# Altium PCB OmniCore_SDR.PcbDoc (part 7 of 13)
Units mil, origin at the board's own origin, x right, y up, seen from the top; angles counter-clockwise.
Board outline 4724.72 x 2755.91 mil, 8 copper layers (Top, GND 1, Layer 1, Layer 2, GND 2, Layer 3, Power, Bottom), stack 40.468 mil thick; 530 components, 427 nets, 2315 pads, 1715 vias.
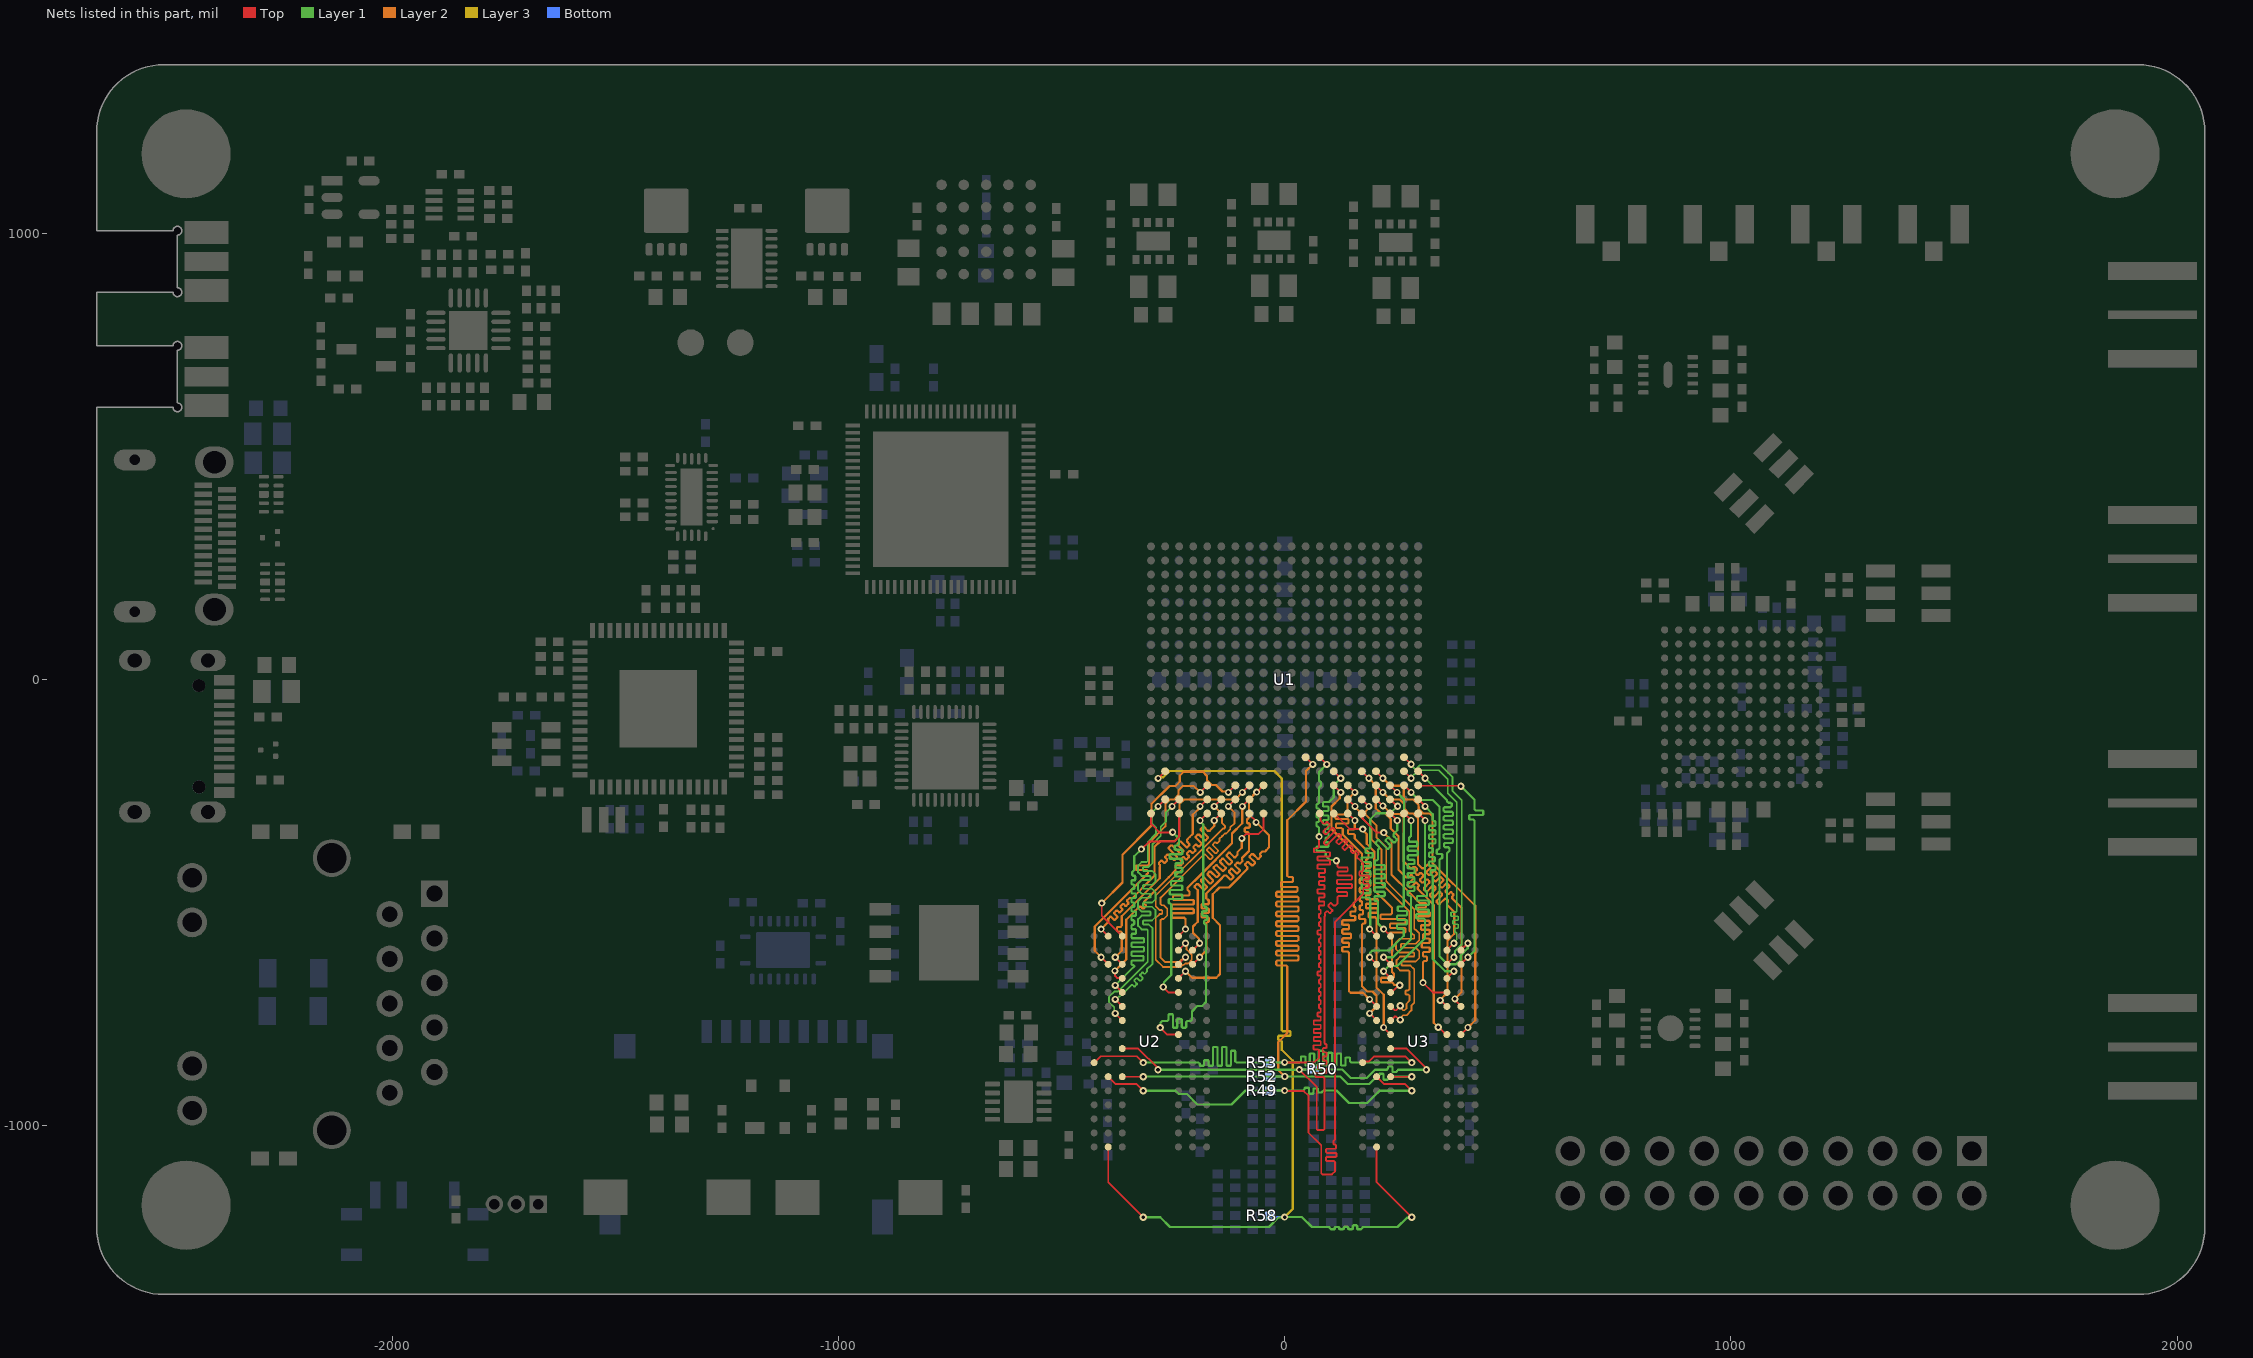
[diagram p12: the nets of this part, all layers, seen from the top]

## Via types
v1: diameter 16, hole 8, Top to Bottom, tented both sides, 1667 vias
v2: diameter 19.68, hole 7.87, Top to Bottom, 44 vias
v3: diameter 200, hole 125, Top to Bottom, 4 vias

## Nets (pads, with @x,y where several pads share a name; then routed paths per layer and width w, separated by ;. In a path a pad name is that pad's centre, name@x,y a point inside that pad or via, vN(x,y) a via of type N, cw(c..) or ccw(c..) an arc to the next point about the centre after c; other vN are vias at no path point) (continued)
DDR3_D6: U1.C1 U2.E3 | length 743.4
  Top w4.2: v1(-379.73,-685.23) U2.E3@-363.98,-700.98 ; v1(-321,-380) -304,-363 -247,-363 -236.46,-352.46 U1.C1@-236.46,-300
  Layer 1 w5: v1(-379.73,-685.23) -339.42,-644.92 -337,-642.5 -337,-642.42 -339.93,-639.49 -341.5,-639.49 -343,-637.99 -343,-630.99 -341.5,-629.49 -317.71,-629.49 -316.21,-627.99 -316.21,-620.99 -317.71,-619.49 -341.5,-619.49 -343,-617.99 -343,-610.99 -341.5,-609.49 -317,-609.49 -315.5,-607.99 -315.5,-600.99 -317,-599.49 -341.5,-599.49 -343,-597.99 -343,-590.99 -341.5,-589.49 -317,-589.49 -315.5,-587.99 -315.5,-580.99 -317,-579.49 -341.5,-579.49 -343,-577.99 -343,-570.99 -341.5,-569.49 -334.59,-569.49 -333.09,-567.99 -333.09,-560.99 -334.59,-559.49 -341.5,-559.49 -343,-557.99 -343,-550.99 -341.5,-549.49 -338.5,-549.49 -337,-547.99 -337,-540.99 -338.5,-539.49 -341.5,-539.49 -343,-537.99 -343,-530.99 -341.5,-529.49 -334.86,-529.49 -333.36,-527.99 -333.36,-520.99 -334.86,-519.49 -341.5,-519.49 -343,-517.99 -343,-510.99 -341.5,-509.49 -338.5,-509.49 -337,-507.99 -337,-500.99 -338.5,-499.49 -341.5,-499.49 -343,-497.99 -343,-490.99 -341.5,-489.49 -334.86,-489.49 -333.36,-487.99 -333.36,-480.99 -334.86,-479.49 -341.5,-479.49 -343,-477.99 -343,-470.99 -341.5,-469.49 -338.5,-469.49 -337,-467.99 -337,-460.99 -338.5,-459.49 -341.5,-459.49 -343,-457.99 -343,-450.99 -341.5,-449.49 -336.14,-449.49 -334.64,-447.99 -334.64,-440.99 -336.14,-439.49 -339.93,-439.49 -341.43,-437.99 -341.43,-430.99 -339.93,-429.49 -337,-426.56 -337,-407 -337,-396 v1(-321,-380)
DDR3_D7: U1.E1 U2.H7 | length 741.3
  Top w4.2: v1(-279,-780) -263.53,-795.47 U2.H7@-238,-795.47 ; v1(-189.5,-315.75) -189.36,-315.75 -173.61,-300 U1.E1@-173.47,-300
  Layer 1 w5: v1(-279,-780) -278.04,-779.04 -278.04,-769.04 -274.22,-765.22 -266,-765.22 -263.5,-765.22 -260.57,-762.29 -260.57,-751.72 -259.07,-750.22 -252.07,-750.22 -250.57,-751.72 -250.57,-778.72 -249.07,-780.22 -242.07,-780.22 -240.57,-778.72 -240.57,-761.91 -239.07,-760.41 -232.07,-760.41 -230.57,-761.91 -230.57,-778.72 -229.07,-780.22 -222.07,-780.22 -220.57,-778.72 -220.57,-768.15 -217.64,-765.22 -210.68,-765.22 -207.75,-762.29 -207.75,-743.75 -195.23,-731.23 -184.75,-731.23 -176.26,-722.74 -176.26,-551.49 -176.26,-550.74 -180.93,-546.07 -180.93,-541.92 -178.01,-538.99 -175.15,-538.99 -173.65,-537.49 -173.65,-530.49 -175.15,-528.99 -183.07,-528.99 -184.57,-527.49 -184.57,-520.49 -183.07,-518.99 -176.16,-518.99 -174.66,-517.49 -174.66,-510.49 -176.16,-508.99 -179.42,-508.99 -182.35,-506.07 -182.35,-353 -182.35,-324.65 -189.5,-317.5 v1(-189.5,-315.75)
DDR3_D8: U1.E2 U2.C3 | length 619
  Top w4.2: v1(-379.73,-622.24) U2.C3@-363.98,-637.99 ; v1(-189.5,-284.25) -189.36,-284.25 -173.61,-268.5 U1.E2@-173.47,-268.5
  Layer 2 w5: v1(-379.73,-622.24) -365.23,-607.74 -365.23,-569.75 -365.23,-567.25 -368.16,-564.32 -374.03,-564.32 -375.53,-562.82 -375.53,-555.82 -374.03,-554.32 -368.16,-554.32 -365.23,-551.39 -365.23,-540 -365.23,-530.23 -280,-445 -280,-422.66 -280,-420 -279.56,-419.56 -279.56,-415.42 -281.94,-413.04 -281.94,-410.92 -276.99,-405.97 -274.87,-405.97 -270.51,-410.33 -268.39,-410.33 -263.44,-405.38 -263.44,-403.26 -267.79,-398.91 -267.79,-396.79 -262.84,-391.84 -260.71,-391.84 -248.46,-404.1 -246.34,-404.1 -241.39,-399.15 -241.39,-397.02 -259.78,-378.63 -259.78,-376.51 -254.83,-371.56 -252.71,-371.56 -234.32,-389.95 -232.2,-389.95 -227.25,-385 -227.25,-382.88 -240.14,-369.99 -240.14,-367.87 -235.19,-362.92 -233.07,-362.92 -220.18,-375.81 -218.05,-375.81 -213.1,-370.86 -213.1,-368.74 -218.85,-362.99 -218.85,-358.85 -212.5,-352.5 -206,-346 -206,-302.99 -189.5,-286.49 v1(-189.5,-284.25)
DDR3_D9: U1.E3 U2.C2 | length 618.3
  Top w4.2: v1(-411.23,-622.24) U2.C2@-395.48,-637.99 ; v1(-189.22,-252.76) U1.E3@-173.47,-237.01
  Layer 2 w5: v1(-411.23,-622.24) -425.73,-607.74 -425.73,-553.24 -381.56,-509.08 -317.24,-444.76 -308.93,-436.44 -306.43,-433.94 -306.43,-429.8 -309.36,-426.87 -332.5,-426.87 -334,-425.37 -334,-418.37 -332.5,-416.87 -306.93,-416.87 -304,-413.94 -304,-386 -304,-365.12 -267.36,-328.48 -267.36,-278.89 -257.47,-269 -247.95,-269 -237.71,-258.76 -237.71,-247.71 -228.26,-238.26 -203.72,-238.26 v1(-189.22,-252.76)
DDR3_D10: U1.G3 U2.A3 | length 618.8
  Top w4.2: v1(-410,-501) -410,-528.98 U2.A3@-363.98,-575 ; v1(-126.23,-252.76) U1.G3@-110.48,-237.01
  Layer 2 w5: v1(-410,-501) -363.5,-454.5 -363.5,-392.5 -298.21,-327.21 -298.21,-278.25 -258.22,-238.26 -244.26,-238.26 -235.22,-229.22 -235.22,-215.25 -226.72,-206.76 -183.21,-206.76 -174,-215.97 -174,-225.49 -163.49,-236 -153.97,-236 -139.32,-250.65 -128.33,-250.65 v1(-126.23,-252.76)
DDR3_D11: U1.H3 U2.A2 | length 619
  Top w4.2: v1(-411.23,-559.25) U2.A2@-395.48,-575 ; v1(-94.73,-252.76) U1.H3@-78.98,-237.01
  Layer 2 w5: v1(-411.23,-559.25) -397.13,-545.15 -395.36,-543.38 -395.36,-539.24 -396.12,-538.48 -396.12,-536.36 -391.17,-531.41 -389.05,-531.41 -382.36,-538.09 -380.24,-538.09 -375.29,-533.14 -375.29,-531.02 -381.98,-524.34 -381.98,-522.22 -377.03,-517.27 -374.9,-517.27 -371.01,-521.16 -368.89,-521.16 -363.94,-516.21 -363.94,-514.09 -367.83,-510.2 -367.83,-508.08 -362.88,-503.13 -360.76,-503.13 -357.27,-506.62 -355.14,-506.62 -350.19,-501.67 -350.19,-499.55 -352.93,-496.81 -352.93,-494.69 -347.98,-489.74 -345.86,-489.74 -341.72,-489.74 -300.49,-448.51 -292,-440.02 -292,-375 -278.5,-361.5 -246.5,-361.5 -236,-351 -236,-279.25 -225.75,-269 -110.98,-269 v1(-94.73,-252.76)
DDR3_D12: U1.J3 U2.C8 | length 616.9
  Top w4.2: U2.C8@-206.5,-637.99 v1(-190.76,-622.24) ; v1(-62.84,-252.15) -62.74,-252.15 -47.6,-237.01 U1.J3@-47.49,-237.01
  Layer 2 w5: v1(-190.76,-622.24) -176.66,-608.14 ; -175.58,-605.01 -175.58,-558.7 -175.58,-546.2 -172.65,-543.27 -171.5,-543.27 -170,-541.77 -170,-534.77 -171.5,-533.27 -184.5,-533.27 -186,-531.77 -186,-524.77 -184.5,-523.27 -171.5,-523.27 -170,-521.77 -170,-514.77 -171.5,-513.27 -184.5,-513.27 -186,-511.77 -186,-504.77 -184.5,-503.27 -171.5,-503.27 -170,-501.77 -170,-494.77 -171.5,-493.27 -172.65,-493.27 -175.58,-490.34 -175.58,-479.58 -144,-448 -135.16,-439.16 -131.02,-439.16 -122.01,-448.17 -119.89,-448.17 -114.94,-443.22 -114.94,-441.09 -124.96,-431.08 -124.96,-428.96 -120.01,-424.01 -117.89,-424.01 -107.87,-434.02 -105.75,-434.02 -100.8,-429.07 -100.8,-426.95 -110.82,-416.94 -110.82,-414.82 -105.87,-409.87 -103.74,-409.87 -101.74,-411.87 -99.62,-411.87 -94.67,-406.92 -94.67,-404.8 -95.66,-403.81 -95.66,-399.66 -80,-384 -80,-359 -80,-347.57 -80,-345.07 -82.93,-342.14 -87.86,-342.14 -89.36,-340.64 -89.36,-333.64 -87.86,-332.14 -80,-332.14 -78.5,-330.64 -78.5,-323.64 -80,-322.14 -83.12,-322.14 -84.62,-320.64 -84.62,-313.64 -83.12,-312.14 -82.93,-312.14 -80,-309.21 -80,-299 -80,-269 -63.15,-252.15 v1(-62.84,-252.15)
DDR3_D13: U1.H2 U2.A7 | length 618.8
  Top w4.2: U2.A7@-238,-575 v1(-222.25,-559.25) ; v1(-94.75,-284.24) U1.H2@-78.98,-268.5
  Layer 2 w5: v1(-222.25,-559.25) -222.25,-536.75 -225.18,-533.82 -250.75,-533.82 -252.25,-532.32 -252.25,-525.32 -250.75,-523.82 -205.5,-523.82 -204,-522.32 -204,-515.32 -205.5,-513.82 -250.75,-513.82 -252.25,-512.32 -252.25,-505.32 -250.75,-503.82 -205.5,-503.82 -204,-502.32 -204,-495.32 -205.5,-493.82 -248.69,-493.82 -250.19,-492.32 -250.19,-485.32 -248.69,-483.82 -214.82,-483.82 -213.32,-482.32 -213.32,-475.32 -214.82,-473.82 -217.75,-470.89 -217.75,-466.75 -190,-439 -118,-367 -118,-344.75 -95.13,-321.88 -95.13,-284.63 v1(-94.75,-284.24)
DDR3_D14: U1.H1 U2.D7 | length 619.7
  Top w4.2: U2.D7@-238,-669.49 v1(-222.25,-653.74) ; U1.H1@-78.98,-300 -78.98,-302.51 -64,-317.49 v1(-64,-320)
  Layer 2 w5: v1(-222.25,-653.74) -207.75,-668.24 -153.24,-668.24 -144.76,-659.76 -144.76,-550.24 -161,-534 -161,-481.09 -145.91,-466 -125,-466 -113.75,-454.75 -83.7,-424.7 -83.7,-420.56 -88.57,-415.68 -88.57,-413.56 -83.62,-408.61 -81.5,-408.61 -73.48,-416.63 -71.36,-416.63 -66.41,-411.68 -66.41,-409.56 -78.08,-397.89 -78.08,-395.77 -73.13,-390.82 -71,-390.82 -60.41,-401.41 -58.29,-401.41 -53.34,-396.46 -53.34,-394.34 -55.41,-392.27 -55.41,-390.15 -50.46,-385.2 -48.34,-385.2 -44.2,-385.2 -41.31,-382.31 -35,-376 -35,-349 v1(-64,-320)
DDR3_D15: U1.J1 U2.B8 | length 619.2
  Top w4.2: U2.B8@-206.5,-606.49 v1(-190.76,-590.75) ; v1(-96,-356) -86,-346 -58,-346 -47.49,-335.49 U1.J1@-47.49,-300
  Layer 2 w5: v1(-190.76,-590.75) -192,-589.5 -192,-581 -205.26,-567.74 -205.26,-553.24 -195,-542.99 -195,-503.64 -195,-476 -194.98,-471.84 -201.49,-465.33 -201.49,-463.21 -196.54,-458.26 -194.41,-458.26 -181.76,-470.91 -179.64,-470.91 -174.69,-465.96 -174.69,-463.84 -187.34,-451.19 -187.34,-449.07 -182.39,-444.12 -180.27,-444.12 -167.62,-456.77 -165.5,-456.77 -160.55,-451.82 -160.55,-449.7 -173.2,-437.05 -173.2,-434.93 -168.25,-429.98 -166.13,-429.98 -153.48,-442.63 -151.36,-442.63 -146.41,-437.68 -146.41,-435.56 -159.06,-422.91 -159.06,-420.79 -154.11,-415.84 -151.99,-415.84 -139.34,-428.49 -137.22,-428.49 -132.27,-423.54 -132.27,-421.42 -144.92,-408.77 -144.92,-406.64 -139.97,-401.69 -137.85,-401.69 -125.2,-414.35 -123.07,-414.35 -118.12,-409.4 -118.12,-407.27 -130.05,-395.35 -130.05,-393.23 -125.1,-388.28 -122.98,-388.28 -113.06,-398.2 -110.94,-398.2 -105.99,-393.25 -105.99,-391.13 -105.99,-386.99 -96,-377 v1(-96,-356)
DDR3_D16: U1.P1 U3.E3 | length 728.2
  Top w4.2: U1.P1@109.99,-300 110.5,-300 145.25,-334.75 174.75,-334.75 v1(175,-335) ; U3.E3@237.51,-700.98 239.77,-700.98 255.75,-685 v1(258,-685)
  Layer 2 w5: v1(175,-335) 175,-337.22 184,-346.22 184,-368.05 200.97,-385.03 200.97,-471.97 240.5,-511.5 240.5,-520 240.5,-523.64 237.57,-526.57 216.5,-526.57 215,-528.07 215,-535.07 216.5,-536.57 269,-536.57 270.5,-538.07 270.5,-545.07 269,-546.57 237.77,-546.57 236.27,-548.07 236.27,-555.07 237.77,-556.57 269,-556.57 270.5,-558.07 270.5,-565.07 269,-566.57 236.45,-566.57 234.95,-568.07 234.95,-575.07 236.45,-576.57 237.57,-576.57 240.5,-579.5 240.5,-582 240.5,-609 240.5,-655.43 243.43,-658.36 244.93,-659.86 244.93,-666.86 243.43,-668.36 217.56,-668.36 216.06,-669.86 216.06,-676.86 217.56,-678.36 240.36,-678.36 245.78,-683.78 246.54,-684.54 257.54,-684.54 v1(258,-685)
DDR3_D17: U1.P3 U3.F2 | length 727.6
  Top w4.2: U1.P3@109.99,-237.01 v1(125.74,-252.76) ; v1(190.27,-716.73) U3.F2@206.02,-732.48
  Layer 2 w5: v1(125.74,-252.76) 123.64,-254.86 123.64,-265.85 105,-284.49 105,-335 159,-389 159,-401 159,-496.64 156.07,-499.57 154.57,-501.07 154.57,-508.07 156.07,-509.57 157.5,-509.57 159,-511.07 159,-518.07 157.5,-519.57 149.13,-519.57 147.63,-521.07 147.63,-528.07 149.13,-529.57 156.76,-529.57 158.26,-531.07 158.26,-538.07 156.76,-539.57 130.5,-539.57 129,-541.07 129,-548.07 130.5,-549.57 142.77,-549.57 144.27,-551.07 144.27,-558.07 142.77,-559.57 130.5,-559.57 129,-561.07 129,-568.07 130.5,-569.57 147.09,-569.57 148.59,-571.07 148.59,-578.07 147.09,-579.57 130.5,-579.57 129,-581.07 129,-588.07 130.5,-589.57 142.77,-589.57 144.27,-591.07 144.27,-598.07 142.77,-599.57 130.5,-599.57 129,-601.07 129,-608.07 130.5,-609.57 141.34,-609.57 144.27,-612.5 144.27,-615 144.27,-698.27 148,-702 175.54,-702 v1(190.27,-716.73)
DDR3_D18: U1.R3 U3.G2 | length 729.7
  Top w4.2: U1.R3@141.49,-237.01 v1(157.24,-252.76) ; v1(190.27,-748.23) U3.G2@206.02,-763.97
  Layer 2 w5: v1(157.24,-252.76) 141,-268.99 141,-294 132.49,-302.51 115.5,-302.51 114,-304.01 114,-311.01 115.5,-312.51 141.24,-312.51 142.74,-314.01 142.74,-321.01 141.24,-322.51 116.74,-322.51 115.24,-324.01 115.24,-331.01 116.74,-332.51 127.07,-332.51 130,-335.44 130,-337.94 130,-347 173.27,-390.27 173.27,-399 173.27,-443.64 170.34,-446.57 169.5,-446.57 168,-448.07 168,-455.07 169.5,-456.57 171.77,-456.57 173.27,-458.07 173.27,-465.07 171.77,-466.57 169.5,-466.57 168,-468.07 168,-475.07 169.5,-476.57 171.77,-476.57 173.27,-478.07 173.27,-485.07 171.77,-486.57 169.5,-486.57 168,-488.07 168,-495.07 169.5,-496.57 171.77,-496.57 173.27,-498.07 173.27,-505.07 171.77,-506.57 169.5,-506.57 168,-508.07 168,-515.07 169.5,-516.57 173.76,-516.57 175.26,-518.07 175.26,-525.07 173.76,-526.57 168.76,-526.57 167.26,-528.07 167.26,-535.07 168.76,-536.57 179.21,-536.57 180.71,-538.07 180.71,-545.07 179.21,-546.57 176.2,-546.57 173.27,-549.5 173.27,-602 173.27,-687.01 185.13,-698.86 196.86,-698.86 206,-708 206,-732.5 v1(190.27,-748.23)
DDR3_D19: U1.R1 U3.H3 | length 727.5
  Top w4.2: U1.R1@141.49,-300 v1(157.24,-315.75) ; v1(221.77,-779.72) U3.H3@237.51,-795.47
  Layer 2 w5: v1(157.24,-315.75) 157.24,-327 157.24,-333.21 154.31,-336.14 143.36,-336.14 141.86,-337.64 141.86,-344.64 143.36,-346.14 154.31,-346.14 157.24,-349.07 157.24,-356.24 169.64,-368.64 188,-387 188,-399.5 185.07,-402.43 183.77,-402.43 182.27,-403.93 182.27,-410.93 183.77,-412.43 190.47,-412.43 191.97,-413.93 191.97,-420.93 190.47,-422.43 183.77,-422.43 182.27,-423.93 182.27,-430.93 183.77,-432.43 190.47,-432.43 191.97,-433.93 191.97,-440.93 190.47,-442.43 183.77,-442.43 182.27,-443.93 182.27,-450.93 183.77,-452.43 190.47,-452.43 191.97,-453.93 191.97,-460.93 190.47,-462.43 183.77,-462.43 182.27,-463.93 182.27,-470.93 183.77,-472.43 190.49,-472.43 191.99,-473.93 191.99,-480.93 190.49,-482.43 183.77,-482.43 182.27,-483.93 182.27,-490.93 183.77,-492.43 207.2,-492.43 208.7,-493.93 208.7,-500.93 207.2,-502.43 183.77,-502.43 182.27,-503.93 182.27,-510.93 183.77,-512.43 206.49,-512.43 207.99,-513.93 207.99,-520.93 206.49,-522.43 189.22,-522.43 187.72,-523.93 187.72,-530.93 189.22,-532.43 203.07,-532.43 206,-535.36 206,-546.68 206,-690.49 221.77,-706.26 v1(221.77,-779.72)
DDR3_D20: U1.T4 U3.H7 | length 727.7
  Top w4.2: U1.T4@172.98,-205.51 v1(188.73,-221.26) ; v1(344,-779) 345.51,-779 361.98,-795.47 U3.H7@363.5,-795.47
  Layer 2 w5: v1(188.73,-221.26) 204,-236.53 204,-288.53 214.61,-299.14 224.12,-299.14 237.56,-312.57 237.56,-333.56 255,-351 255,-426 271,-442 272.77,-443.77 276.91,-443.77 282.41,-438.26 284.54,-438.26 289.49,-443.21 289.49,-445.33 275.83,-458.99 275.83,-461.11 280.78,-466.06 282.91,-466.06 293.41,-455.55 295.54,-455.55 300.49,-460.5 300.49,-462.62 298.12,-464.98 298.12,-469.12 306.23,-477.23 308,-479 334,-505 334,-769 v1(344,-779)
DDR3_D21: U1.U4 U3.H8 | length 727.4
  Top w4.2: U1.U4@204.48,-205.51 v1(220.23,-221.26) ; U3.H8@394.99,-795.47 v1(410.74,-779.72)
  Layer 2 w5: v1(220.23,-221.26) 236.97,-238 260,-238 267,-245 267,-264 272,-269 288.47,-269 300,-280.53 300,-286 300.22,-286.22 300.22,-290.26 309.96,-300 325.07,-300 331,-305.93 331,-411 427,-507 427,-763.46 v1(410.74,-779.72)
DDR3_D22: U1.U2 U3.F7 | length 727.5
  Top w4.2: U1.U2@204.48,-268.5 204.99,-268.5 219.49,-283 v1(220,-283) ; v1(348.5,-719) 349.26,-719 362.74,-732.48 U3.F7@363.5,-732.48
  Layer 2 w5: v1(220,-283) 220.71,-283 238.96,-301.24 258.29,-301.24 266.79,-309.74 266.79,-407.79 280,-421 281.77,-422.77 285.91,-422.77 288.71,-419.97 292.24,-419.97 295.78,-423.51 295.78,-427.04 292.68,-430.14 292.68,-433.68 296.21,-437.21 299.75,-437.21 302.85,-434.11 306.39,-434.11 309.92,-437.65 309.92,-441.18 303.68,-447.43 303.68,-450.96 307.21,-454.5 310.75,-454.5 316.99,-448.26 320.53,-448.26 324.06,-451.79 324.06,-455.33 312.33,-467.06 312.33,-470.6 315.86,-474.13 319.4,-474.13 331.13,-462.4 334.67,-462.4 338.2,-465.93 338.2,-469.47 326.47,-481.2 326.47,-484.74 330,-488.28 333.54,-488.28 345.28,-476.54 348.81,-476.54 352.35,-480.07 352.35,-483.61 340.61,-495.35 340.61,-498.88 344.15,-502.42 347.68,-502.42 359.13,-490.96 362.67,-490.96 366.21,-494.5 366.21,-498.04 363.69,-500.55 363.69,-504.69 380,-521 380,-550 380,-569.49 364.75,-584.74 364.75,-701.25 348.5,-717.5 v1(348.5,-719)
DDR3_D23: U1.U3 U3.F8 | length 728.6
  Top w4.2: U1.U3@204.48,-237.01 v1(220.23,-252.76) ; v1(381.49,-715.55) 381.49,-717.26 394.99,-730.77 U3.F8@394.99,-732.48
  Layer 2 w5: v1(220.23,-252.76) 236.47,-269 258.51,-269 268.39,-278.89 268.39,-289.93 278.28,-299.82 287.82,-299.82 299,-311 299,-414 306,-421 307.77,-422.77 311.91,-422.77 319.91,-414.76 322.04,-414.76 326.99,-419.71 326.99,-421.83 317.97,-430.85 317.97,-432.97 322.92,-437.92 325.04,-437.92 334.06,-428.91 336.18,-428.91 341.13,-433.86 341.13,-435.98 332.11,-444.99 332.11,-447.11 337.06,-452.06 339.18,-452.06 348.2,-443.05 350.32,-443.05 355.27,-448 355.27,-450.12 346.26,-459.13 346.26,-461.26 351.2,-466.2 353.33,-466.2 362.34,-457.19 364.46,-457.19 369.41,-462.14 369.41,-464.26 360.4,-473.28 360.4,-475.4 365.35,-480.35 367.47,-480.35 371.34,-476.47 373.46,-476.47 378.41,-481.42 378.41,-483.54 375.55,-486.41 375.55,-490.55 396,-511 396,-524 396,-701.04 v1(381.49,-715.55)
DDR3_D24: U1.V1 U3.A3 | length 576.9
  Top w4.2: v1(221.77,-559.25) U3.A3@237.51,-575 ; U1.V1@235.98,-300 236.26,-300 252,-315.74 v1(252.29,-315.74)
  Layer 1 w5: v1(221.77,-559.25) 209,-546.48 209,-501 209,-498.5 206.07,-495.57 202.5,-495.57 201,-494.07 201,-487.07 202.5,-485.57 222.5,-485.57 224,-484.07 224,-477.07 222.5,-475.57 202.5,-475.57 201,-474.07 201,-467.07 202.5,-465.57 222.5,-465.57 224,-464.07 224,-457.07 222.5,-455.57 202.5,-455.57 201,-454.07 201,-447.07 202.5,-445.57 222.5,-445.57 224,-444.07 224,-437.07 222.5,-435.57 202.5,-435.57 201,-434.07 201,-427.07 202.5,-425.57 222.5,-425.57 224,-424.07 224,-417.07 222.5,-415.57 203.27,-415.57 201.77,-414.07 201.77,-407.07 203.27,-405.57 206.07,-405.57 209,-402.64 209,-395 209,-381 209.5,-380.5 211.27,-378.73 211.27,-374.59 203.79,-367.11 203.79,-364.99 208.74,-360.04 210.86,-360.04 229.96,-379.14 232.08,-379.14 237.03,-374.19 237.03,-372.06 226.29,-361.33 226.29,-359.21 231.24,-354.26 233.37,-354.26 244.1,-364.99 246.22,-364.99 251.17,-360.04 251.17,-357.92 243.69,-350.45 243.69,-346.31 245.5,-344.5 252.29,-337.71 v1(252.29,-315.74)
DDR3_D25: U1.Y3 U3.C8 | length 577.2
  Top w4.2: U1.Y3@298.97,-237.01 299.96,-238 394,-238 v1(395,-239) ; U3.C8@394.99,-637.99 v1(410.74,-622.24)
  Layer 1 w5: v1(395,-239) 425.24,-269.24 425.24,-288 425.24,-290.5 428.17,-293.43 443.74,-293.43 445.24,-294.93 445.24,-301.93 443.74,-303.43 415.12,-303.43 413.62,-304.93 413.62,-311.93 415.12,-313.43 422.31,-313.43 425.24,-316.36 425.24,-330 425.24,-607.74 v1(410.74,-622.24)
DDR3_D26: U1.W1 U3.C3 | length 577.2
  Top w4.2: v1(221.77,-622.24) U3.C3@237.51,-637.99 ; U1.W1@267.47,-300 v1(283.22,-315.75)
  Layer 1 w5: v1(221.77,-622.24) 242.76,-622.24 283.22,-581.78 283.22,-489 283.22,-486.5 280.29,-483.57 277.5,-483.57 276,-482.07 276,-475.07 277.5,-473.57 289.34,-473.57 290.84,-472.07 290.84,-465.07 289.34,-463.57 277.5,-463.57 276,-462.07 276,-455.07 277.5,-453.57 289.34,-453.57 290.84,-452.07 290.84,-445.07 289.34,-443.57 277.5,-443.57 276,-442.07 276,-435.07 277.5,-433.57 289.34,-433.57 290.84,-432.07 290.84,-425.07 289.34,-423.57 277.5,-423.57 276,-422.07 276,-415.07 277.5,-413.57 289.34,-413.57 290.84,-412.07 290.84,-405.07 289.34,-403.57 277.5,-403.57 276,-402.07 276,-395.07 277.5,-393.57 296.72,-393.57 298.22,-392.07 298.22,-385.07 296.72,-383.57 277.5,-383.57 276,-382.07 276,-375.07 277.5,-373.57 295.83,-373.57 297.33,-372.07 297.33,-365.07 295.83,-363.57 280.29,-363.57 278.79,-362.07 278.79,-355.07 280.29,-353.57 283.22,-350.64 283.22,-336 v1(283.22,-315.75)
DDR3_D27: U1.Y4 U3.A7 | length 576.9
  Top w4.2: U1.Y4@298.97,-205.51 v1(314.72,-221.26) ; U3.A7@363.5,-575 363.75,-574.75 363.75,-555.25 v1(364,-555)
  Layer 1 w5: v1(314.72,-221.26) 364,-270.54 364,-273.04 366.93,-275.97 371.9,-275.97 374.4,-278.47 374.4,-283.47 371.9,-285.97 358.5,-285.97 356,-288.47 356,-293.47 358.5,-295.97 374.74,-295.97 377.24,-298.47 377.24,-303.47 374.74,-305.97 358.5,-305.97 356,-308.47 356,-313.47 358.5,-315.97 374.74,-315.97 377.24,-318.47 377.24,-323.47 374.74,-325.97 358.5,-325.97 356,-328.47 356,-333.47 358.5,-335.97 374.74,-335.97 377.24,-338.47 377.24,-343.47 374.74,-345.97 358.5,-345.97 356,-348.47 356,-353.47 358.5,-355.97 374.74,-355.97 377.24,-358.47 377.24,-363.47 374.74,-365.97 359.31,-365.97 356.81,-368.47 356.81,-373.47 359.31,-375.97 366.93,-375.97 369.43,-378.47 369.43,-383.47 366.93,-385.97 364,-388.9 364,-405 v1(364,-555)
DDR3_D28: U1.Y2 U3.D7 | length 577.1
  Top w4.2: U1.Y2@298.97,-268.5 v1(314.72,-284.25) ; U3.D7@363.5,-669.49 v1(379.25,-653.74)
  Layer 1 w5: v1(314.72,-284.25) 332,-301.54 332,-312 332,-314.5 334.93,-317.43 336.5,-317.43 338,-318.93 338,-325.93 336.5,-327.43 325.22,-327.43 323.72,-328.93 323.72,-335.93 325.22,-337.43 336.5,-337.43 338,-338.93 338,-345.93 336.5,-347.43 325.22,-347.43 323.72,-348.93 323.72,-355.93 325.22,-357.43 336.5,-357.43 338,-358.93 338,-365.93 336.5,-367.43 325.22,-367.43 323.72,-368.93 323.72,-375.93 325.22,-377.43 330.5,-377.43 332,-378.93 332,-385.93 330.5,-387.43 325.22,-387.43 323.72,-388.93 323.72,-395.93 325.22,-397.43 334.85,-397.43 336.35,-398.93 336.35,-405.93 334.85,-407.43 325.22,-407.43 323.72,-408.93 323.72,-415.93 325.22,-417.43 336.5,-417.43 338,-418.93 338,-425.93 336.5,-427.43 328.54,-427.43 327.04,-428.93 327.04,-435.93 328.54,-437.43 329.07,-437.43 332,-440.36 332,-446.27 332,-626 359.74,-653.74 v1(379.25,-653.74)
DDR3_D29: U1.W3 U3.B8 | length 577.1
  Top w4.2: U1.W3@267.47,-237.01 v1(283.22,-252.76) ; U3.B8@394.99,-606.49 v1(410.74,-590.75)
  Layer 1 w5: v1(283.22,-252.76) 300.22,-269.75 331.75,-269.75 347,-285 347,-365.43 347,-377.93 344.07,-380.86 342.5,-380.86 341,-382.36 341,-389.36 342.5,-390.86 351.8,-390.86 353.3,-392.36 353.3,-399.36 351.8,-400.86 349.93,-400.86 347,-403.79 347,-415 347,-620 365,-638 383.99,-638 394.36,-627.63 394.36,-618.11 410.28,-602.2 410.28,-591.21 v1(410.74,-590.75)
DDR3_D30: U1.V2 U3.A2 | length 577.1
  Top w4.2: v1(190.27,-559.25) U3.A2@206.02,-575 ; U1.V2@235.98,-268.5 236.74,-268.5 252.24,-284 v1(253,-284)
  Layer 1 w5: v1(190.27,-559.25) 192,-557.52 192,-513 192,-494 192,-491.5 189.07,-488.57 173.5,-488.57 172,-487.07 172,-480.07 173.5,-478.57 190.5,-478.57 192,-477.07 192,-470.07 190.5,-468.57 173.5,-468.57 172,-467.07 172,-460.07 173.5,-458.57 190.5,-458.57 192,-457.07 192,-450.07 190.5,-448.57 173.5,-448.57 172,-447.07 172,-440.07 173.5,-438.57 190.5,-438.57 192,-437.07 192,-430.07 190.5,-428.57 173.5,-428.57 172,-427.07 172,-420.07 173.5,-418.57 191.27,-418.57 192.77,-417.07 192.77,-410.07 191.27,-408.57 173.5,-408.57 172,-407.07 172,-400.07 173.5,-398.57 196.12,-398.57 197.62,-397.07 197.62,-390.07 196.12,-388.57 182.83,-388.57 181.33,-387.07 181.33,-380.07 182.83,-378.57 189.07,-378.57 192,-375.64 192,-369 192,-351 192,-313 205.32,-299.68 236.3,-299.68 251.98,-284 v1(253,-284)
DDR3_D31: U1.V3 U3.C2 | length 577.8
  Top w4.2: v1(190.27,-622.24) U3.C2@206.02,-637.99 ; U1.V3@235.98,-237.01 v1(251.72,-252.76)
  Layer 1 w5: v1(190.27,-622.24) 191.97,-620.54 191.97,-612.03 197,-607 234,-607 267,-574 267,-564 267,-561.5 264.07,-558.57 253.5,-558.57 252,-557.07 252,-550.07 253.5,-548.57 272.72,-548.57 274.22,-547.07 274.22,-540.07 272.72,-538.57 253.5,-538.57 252,-537.07 252,-530.07 253.5,-528.57 272.72,-528.57 274.22,-527.07 274.22,-520.07 272.72,-518.57 255.03,-518.57 253.53,-517.07 253.53,-510.07 255.03,-508.57 264.07,-508.57 267,-505.64 267,-344 267.5,-343.5 267.5,-268.53 v1(251.72,-252.76)
DDR3_DM0: U1.A1 U2.E7 | length 741.2
  Top w4.2: U1.A1@-299.46,-300 -299.46,-323.27 -279.73,-343 -252,-343 v1(-251,-342) ; v1(-272,-689) -272,-689.77 -260.79,-700.98 U2.E7@-238,-700.98
  Layer 1 w5: v1(-272,-689) -270.54,-687.54 -270.54,-678.54 -254,-662 -254,-507 -254,-504.5 -256.93,-501.57 -258.5,-501.57 -260,-500.07 -260,-493.07 -258.5,-491.57 -231,-491.57 -229.5,-490.07 -229.5,-483.07 -231,-481.57 -255.88,-481.57 -257.38,-480.07 -257.38,-473.07 -255.88,-471.57 -231,-471.57 -229.5,-470.07 -229.5,-463.07 -231,-461.57 -253.36,-461.57 -254.86,-460.07 -254.86,-453.07 -253.36,-451.57 -231,-451.57 -229.5,-450.07 -229.5,-443.07 -231,-441.57 -243.56,-441.57 -245.06,-440.07 -245.06,-433.07 -243.56,-431.57 -231,-431.57 -229.5,-430.07 -229.5,-423.07 -231,-421.57 -243,-421.57 -244.5,-420.07 -244.5,-413.07 -243,-411.57 -231,-411.57 -229.5,-410.07 -229.5,-403.07 -231,-401.57 -256.5,-401.57 -258,-400.07 -258,-393.07 -256.5,-391.57 -231,-391.57 -229.5,-390.07 -229.5,-383.07 -231,-381.57 -244.92,-381.57 -246.42,-380.07 -246.42,-373.07 -244.92,-371.57 -239.93,-371.57 -237,-368.64 -237,-364 -237,-356 v1(-251,-342)
DDR3_DM1: U1.F1 U2.D3 | length 619.3
  Top w4.2: v1(-380.6,-652.87) -379.95,-653.52 -379.95,-664.05 -375.06,-668.94 -364.53,-668.94 U2.D3@-363.98,-669.49 ; v1(-157.72,-315.75) U1.F1@-141.98,-300
  Layer 2 w5: v1(-380.6,-652.87) -355,-627.27 -355,-537.95 -335.16,-518.11 -326.32,-509.27 -322.18,-509.27 -318.42,-513.03 -316.3,-513.03 -311.35,-508.08 -311.35,-505.96 -315.11,-502.2 -315.11,-498.06 -260.03,-442.97 -244.5,-427.45 -244.5,-425.5 -244.5,-417.82 -241.57,-414.89 -237.43,-414.89 -235.75,-416.57 -233.63,-416.57 -228.68,-411.62 -228.68,-409.5 -232.86,-405.32 -232.86,-403.2 -227.91,-398.25 -225.79,-398.25 -221.61,-402.43 -219.48,-402.43 -214.53,-397.48 -214.53,-395.36 -218.71,-391.18 -218.71,-389.06 -213.76,-384.11 -211.64,-384.11 -207.46,-388.29 -205.34,-388.29 -200.39,-383.34 -200.39,-381.22 -204.61,-377 -204.61,-374.88 -199.66,-369.93 -197.54,-369.93 -193.32,-374.15 -191.2,-374.15 -186.25,-369.2 -186.25,-367.08 -199.24,-354.09 -199.24,-351.97 -194.29,-347.02 -192.17,-347.02 -179.18,-360 -177.06,-360 -172.11,-355.06 -172.11,-352.93 -188.08,-336.96 -188.08,-334.84 -183.13,-329.89 -181.01,-329.89 -172.28,-338.62 -168.14,-338.62 -163.76,-334.24 -157.72,-328.21 v1(-157.72,-315.75)
DDR3_DM2: U1.T1 U3.E7 | length 727.8
  Top w4.2: U1.T1@172.98,-300 174.54,-301.56 174.54,-311.48 205.6,-342.54 221.54,-342.54 v1(222,-343) ; v1(310,-679) 331.98,-700.98 U3.E7@363.5,-700.98
  Layer 2 w5: v1(222,-343) 239.5,-360.5 239.5,-437.5 280,-478 302.5,-500.5 315.27,-500.5 316.77,-502 316.77,-509 315.27,-510.5 300.5,-510.5 299,-512 299,-519 300.5,-520.5 323.5,-520.5 325,-522 325,-529 323.5,-530.5 300.5,-530.5 299,-532 299,-539 300.5,-540.5 323.5,-540.5 325,-542 325,-549 323.5,-550.5 306.94,-550.5 305.44,-552 305.44,-559 306.94,-560.5 323.5,-560.5 325,-562 325,-569 323.5,-570.5 311.5,-570.5 310,-572 310,-579 311.5,-580.5 323.5,-580.5 325,-582 325,-589 323.5,-590.5 308.51,-590.5 307.01,-592 307.01,-599 308.51,-600.5 323.5,-600.5 325,-602 325,-609 323.5,-610.5 311.5,-610.5 310,-612 310,-619 311.5,-620.5 317.32,-620.5 318.82,-622 318.82,-629 317.32,-630.5 312.93,-630.5 310,-633.43 310,-651 v1(310,-679)
DDR3_DM3: U1.Y1 U3.D3 | length 576.8
  Top w4.2: v1(221.77,-653.74) U3.D3@237.51,-669.49 ; U1.Y1@298.97,-300 v1(314.72,-315.75)
  Layer 1 w5: v1(221.77,-653.74) 233.5,-642 252,-642 314.72,-579.28 314.72,-540.57 314.72,-538.07 311.79,-535.14 296.22,-535.14 294.72,-533.64 294.72,-526.64 296.22,-525.14 321.5,-525.14 323,-523.64 323,-516.64 321.5,-515.14 296.22,-515.14 294.72,-513.64 294.72,-506.64 296.22,-505.14 321.5,-505.14 323,-503.64 323,-496.64 321.5,-495.14 297.74,-495.14 296.24,-493.64 296.24,-486.64 297.74,-485.14 317.65,-485.14 319.15,-483.64 319.15,-476.64 317.65,-475.14 314.72,-472.21 314.72,-367 314.72,-344 v1(314.72,-315.75)
DDR3_DQS0_N: U1.B2 U2.G3 | length 739.2
  Top w4: v1(-379.73,-748.23) U2.G3@-363.98,-763.97 ; v1(-283.71,-284.25) U1.B2@-267.96,-268.5
  Layer 1 w4: v1(-379.73,-748.23) -382.03,-745.93 -382.03,-734.23 -393.73,-722.53 -393.73,-710.93 -382.04,-699.23 -373.93,-699.23 -313.7,-639 -307,-632.3 -307,-567.42 -307,-562.2 -309.34,-559.86 -320.71,-559.86 -328.5,-552.07 -328.5,-536.65 -320.71,-528.86 -301.85,-528.86 -300.5,-527.51 -300.5,-521.21 -301.85,-519.86 -320.71,-519.86 -328.5,-512.07 -328.5,-496.65 -320.71,-488.86 -301.85,-488.86 -300.5,-487.51 -300.5,-481.21 -301.85,-479.86 -320.71,-479.86 -328.5,-472.07 -328.5,-456.65 -320.71,-448.86 -301.85,-448.86 -300.5,-447.51 -300.5,-441.21 -301.85,-439.86 -320.71,-439.86 -328.5,-432.07 -328.5,-416.65 -320.71,-408.86 -309.34,-408.86 -307,-406.52 -307,-393 -307,-364.1 -288.56,-345.65 -288.56,-330.7 -297.71,-321.55 -297.71,-298.25 v1(-283.71,-284.25)
DDR3_DQS0_P: U1.C2 U2.F3 | length 738.6
  Top w4: v1(-379.73,-716.73) U2.F3@-363.98,-732.48 ; v1(-252.21,-284.25) U1.C2@-236.46,-268.5
  Layer 1 w4: v1(-379.73,-716.73) -377.89,-716.73 -371.39,-710.23 -369.38,-710.23 -351.57,-692.43 -343.79,-684.65 -340.48,-684.65 -337.53,-687.6 -335.62,-687.6 -331.17,-683.14 -331.17,-681.24 -336.94,-675.46 -336.94,-673.55 -332.48,-669.1 -330.57,-669.1 -324.8,-674.87 -322.89,-674.87 -318.44,-670.42 -318.44,-668.51 -323.97,-662.98 -323.97,-661.07 -319.51,-656.61 -317.6,-656.61 -315.02,-659.19 -313.11,-659.19 -308.66,-654.74 -308.66,-652.83 -308.66,-649.52 -298.14,-639 -296,-636.86 -296,-567.42 -296,-557.65 -304.79,-548.86 -316.15,-548.86 -317.5,-547.51 -317.5,-541.21 -316.15,-539.86 -297.29,-539.86 -289.5,-532.07 -289.5,-516.65 -297.29,-508.86 -316.15,-508.86 -317.5,-507.51 -317.5,-501.21 -316.15,-499.86 -297.29,-499.86 -289.5,-492.07 -289.5,-476.65 -297.29,-468.86 -316.15,-468.86 -317.5,-467.51 -317.5,-461.21 -316.15,-459.86 -297.29,-459.86 -289.5,-452.07 -289.5,-436.65 -297.29,-428.86 -316.15,-428.86 -317.5,-427.51 -317.5,-421.21 -316.15,-419.86 -304.79,-419.86 -296,-411.07 -296,-393 -296,-368.65 -277.56,-350.21 -277.56,-329.4 -266.21,-318.05 -266.21,-298.25 v1(-252.21,-284.25)
DDR3_DQS1_N: U1.F2 U2.B7 | length 618.8
  Top w4: U2.B7@-238,-606.49 v1(-222.25,-590.75) ; v1(-157.72,-284.25) U1.F2@-141.98,-268.5
  Layer 2 w4: v1(-222.25,-590.75) -219.96,-593.04 -219.96,-604.74 -208.25,-616.44 -208.25,-628.04 -216.45,-636.24 -223.04,-636.24 -226.04,-639.24 -227.55,-639.24 -232.4,-644.09 -272.47,-644.09 -289,-627.56 -289,-549 -289,-534.35 -280.21,-525.57 -275.71,-525.57 -274.36,-524.22 -274.36,-517.92 -275.71,-516.57 -280.21,-516.57 -289,-507.78 -289,-498 -289,-483.97 -138.93,-333.89 -135.88,-333.89 -133.54,-331.55 -133.54,-328.24 -140.23,-321.55 -140.23,-301.75 v1(-157.72,-284.25)
DDR3_DQS1_P: U1.G2 U2.C7 | length 619.1
  Top w4: U2.C7@-238,-637.99 v1(-222.25,-622.24) ; v1(-126.23,-284.25) U1.G2@-110.48,-268.5
  Layer 2 w4: v1(-222.25,-622.24) -224.6,-622.24 -230.6,-628.24 -232.11,-628.24 -236.96,-633.09 -267.91,-633.09 -278,-623 -278,-549 -278,-538.91 -275.66,-536.57 -271.15,-536.57 -263.36,-528.77 -263.36,-513.36 -271.15,-505.57 -275.66,-505.57 -278,-503.22 -278,-498 -278,-488.52 -189.24,-399.76 -181.46,-391.98 -178.15,-391.98 -167.53,-402.6 -165.62,-402.6 -161.17,-398.14 -161.17,-396.24 -174.61,-382.8 -174.61,-380.89 -170.15,-376.43 -168.24,-376.43 -155.69,-388.98 -153.78,-388.98 -149.33,-384.53 -149.33,-382.62 -160.71,-371.23 -160.71,-369.32 -156.26,-364.87 -154.35,-364.87 -152.69,-366.53 -150.78,-366.53 -146.33,-362.07 -146.33,-360.16 -146.33,-356.85 -140.24,-350.76 -134.37,-344.89 -131.33,-344.89 -121.78,-335.35 -121.78,-331.1 -112.23,-321.55 -112.23,-298.25 v1(-126.23,-284.25)
DDR3_DQS2_N: U1.T2 U3.G3 | length 730.1
  Top w4: U1.T2@172.98,-268.5 v1(188.73,-284.25) ; U3.G3@237.51,-763.97 246.26,-755.23 250.2,-755.23 257.52,-762.55 257.52,-763.97 v1(259,-762.5)
  Layer 2 w4: v1(188.73,-284.25) 188.73,-287.5 181.48,-294.75 181.48,-302.87 206,-327.38 206,-354 227.72,-375.72 227.72,-452.17 234.78,-459.22 290.5,-514.94 290.5,-553.22 290.5,-558.44 292.84,-560.79 293.71,-560.79 301.5,-568.58 301.5,-583.99 293.71,-591.79 261.85,-591.79 260.5,-593.14 260.5,-599.44 261.85,-600.79 293.71,-600.79 301.5,-608.58 301.5,-623.99 293.71,-631.79 263.06,-631.79 261.71,-633.14 261.71,-639.44 263.06,-640.79 281.71,-640.79 290.5,-649.57 290.5,-667 290.5,-724.44 284,-730.94 284,-741.36 273.11,-752.25 265.24,-752.25 262.89,-754.59 262.89,-755.35 259,-759.25 v1(259,-762.5)
DDR3_DQS2_P: U1.R2 U3.F3 | length 730.3
  Top w4: U1.R2@141.49,-268.5 141.69,-268.5 157.44,-284.25 v1(157.64,-284.25) ; U3.F3@238.99,-731 U3.F3@237.51,-732.48 246.26,-741.23 250.2,-741.23 259,-732.43 v1(259,-731)
  Layer 2 w4: v1(157.64,-284.25) 157.64,-285.68 166.82,-294.87 166.82,-303.76 195,-331.94 195,-358.56 216.72,-380.28 216.72,-456.72 230.89,-470.89 279.5,-519.5 279.5,-553.22 279.5,-563 288.29,-571.79 289.15,-571.79 290.5,-573.14 290.5,-579.44 289.15,-580.79 257.29,-580.79 249.5,-588.58 249.5,-603.99 257.29,-611.79 289.15,-611.79 290.5,-613.14 290.5,-619.44 289.15,-620.79 258.51,-620.79 250.71,-628.58 250.71,-643.99 258.51,-651.79 277.16,-651.79 279.5,-654.13 279.5,-667 279.5,-675 279.5,-694.31 277.16,-696.66 271.92,-696.66 270.57,-698.01 270.57,-704.31 271.92,-705.66 277.16,-705.66 279.5,-708 279.5,-710 279.5,-719.89 273,-726.39 273,-736.8 268.55,-741.25 265.24,-741.25 262.89,-738.9 262.89,-738.14 259,-734.25 v1(259,-731)
DDR3_DQS3_N: U1.W4 U3.B7 | length 576.8
  Top w4: U1.W4@267.47,-205.51 v1(283.22,-221.26) ; U3.B7@363.5,-606.49 v1(379.25,-590.75)
  Layer 1 w4: v1(283.22,-221.26) 283.22,-218.92 291.13,-211.01 299,-211.01 307.01,-203 345,-203 365.37,-223.37 365.37,-254.93 385.74,-275.3 385.74,-508 385.74,-519 383.4,-521.34 373.85,-521.34 372.5,-522.69 372.5,-528.99 373.85,-530.34 387.39,-530.34 388.74,-531.69 388.74,-537.99 387.39,-539.34 378.49,-539.34 377.14,-540.69 377.14,-546.99 378.49,-548.34 387.39,-548.34 388.74,-549.69 388.74,-555.99 387.39,-557.34 382.47,-557.34 381.12,-558.69 381.12,-564.99 382.47,-566.34 383.4,-566.34 385.74,-568.69 385.74,-581.17 385.74,-582.4 379.25,-588.9 v1(379.25,-590.75)
DDR3_DQS3_P: U1.W5 U3.C7 | length 576.8
  Top w4: U1.W5@267.47,-174.02 v1(283.22,-189.76) ; U3.C7@363.5,-637.99 v1(379.25,-622.24)
  Layer 1 w4: v1(283.22,-189.76) 283.22,-192.1 291.13,-200.01 294.44,-200.01 302.46,-192 349.56,-192 376.37,-218.81 376.37,-250.37 396.74,-270.74 396.74,-593.5 381.54,-608.7 381.54,-619.95 v1(379.25,-622.24)
DDR3_ODT: R53.2 U1.N5 U2.K1 U3.K1 | length 2637.1
  Top w4.2: U2.K1@-426.98,-858.46 -412.51,-844 -331.32,-844 v1(-316.85,-858.46) ; v1(0,-858) 12,-858 66,-858 77,-847 77,-833.25 77,-831.15 74.54,-828.69 65.81,-828.69 64.89,-827.77 64.89,-820.41 65.81,-819.49 79.78,-819.49 80.7,-818.57 80.7,-811.21 79.78,-810.29 66.02,-810.29 65.1,-809.37 65.1,-802.01 66.02,-801.09 79.78,-801.09 80.7,-800.17 80.7,-792.81 79.78,-791.89 66.02,-791.89 65.1,-790.97 65.1,-783.61 66.02,-782.69 79.78,-782.69 80.7,-781.77 80.7,-774.41 79.78,-773.49 66.02,-773.49 65.1,-772.57 65.1,-765.21 66.02,-764.29 79.78,-764.29 80.7,-763.37 80.7,-756.01 79.78,-755.09 74.84,-755.09 73.92,-754.17 73.92,-746.81 74.84,-745.89 79.78,-745.89 80.7,-744.97 80.7,-737.61 79.78,-736.69 77.92,-736.69 77,-735.77 77,-728.41 77.92,-727.49 79.78,-727.49 80.7,-726.57 80.7,-719.21 79.78,-718.29 77.57,-718.29 76.64,-717.37 76.64,-710.01 77.57,-709.09 79.78,-709.09 80.7,-708.17 80.7,-700.81 79.78,-699.89 77.92,-699.89 77,-698.97 77,-691.61 77.92,-690.69 79.78,-690.69 80.7,-689.77 80.7,-682.41 79.78,-681.49 77.92,-681.49 77,-680.57 77,-673.21 77.92,-672.29 79.78,-672.29 80.7,-671.37 80.7,-664.01 79.78,-663.09 74.84,-663.09 73.92,-662.17 73.92,-654.81 74.84,-653.89 79.78,-653.89 80.7,-652.97 80.7,-645.61 79.78,-644.69 77.92,-644.69 77,-643.77 77,-636.41 77.92,-635.49 79.78,-635.49 80.7,-634.57 80.7,-627.21 79.78,-626.29 77.57,-626.29 76.64,-625.37 76.64,-618.01 77.57,-617.09 79.78,-617.09 80.7,-616.17 80.7,-608.81 79.78,-607.89 77.92,-607.89 77,-606.97 77,-599.61 77.92,-598.69 79.78,-598.69 80.7,-597.77 80.7,-590.41 79.78,-589.49 77.92,-589.49 77,-588.57 77,-581.21 77.92,-580.29 79.78,-580.29 80.7,-579.37 80.7,-572.01 79.78,-571.09 74.84,-571.09 73.92,-570.17 73.92,-562.81 74.84,-561.89 79.78,-561.89 80.7,-560.97 80.7,-553.61 79.78,-552.69 77.92,-552.69 77,-551.77 77,-544.41 77.92,-543.49 79.78,-543.49 80.7,-542.57 80.7,-535.21 79.78,-534.29 77.57,-534.29 76.64,-533.37 76.64,-526.01 77.57,-525.09 79.78,-525.09 80.7,-524.17 80.7,-516.81 79.78,-515.89 77.92,-515.89 77,-514.97 77,-507.61 77.92,-506.69 87.74,-506.69 88.66,-505.77 88.66,-498.41 87.74,-497.49 77.92,-497.49 77,-496.57 77,-489.21 77.92,-488.29 87.98,-488.29 88.9,-487.37 88.9,-480.01 87.98,-479.09 74.84,-479.09 73.92,-478.17 73.92,-470.81 74.84,-469.89 87.98,-469.89 88.9,-468.97 88.9,-461.61 87.98,-460.69 77.92,-460.69 77,-459.77 77,-452.41 77.92,-451.49 88.98,-451.49 89.9,-450.57 89.9,-443.21 88.98,-442.29 77.57,-442.29 76.64,-441.37 76.64,-434.01 77.57,-433.09 89.05,-433.09 89.97,-432.17 89.97,-424.81 89.05,-423.89 74.77,-423.89 73.85,-422.97 73.85,-415.61 74.77,-414.69 100.98,-414.69 101.9,-413.77 101.9,-406.41 100.98,-405.49 74.77,-405.49 73.85,-404.57 73.85,-397.21 74.77,-396.29 100.98,-396.29 101.9,-395.37 101.9,-388.01 100.98,-387.09 66.55,-387.09 65.63,-386.17 65.63,-378.81 66.55,-377.89 74.54,-377.89 77,-375.43 77,-368 v1(77,-352) ; U1.N5@78.5,-174.02 78.5,-174.13 94.24,-189.88 v1(94.24,-190) ; U3.K1@174.52,-858.46 176.73,-856.26 188.48,-856.26 200.23,-844.5 270.68,-844.5 v1(284.64,-858.46)
  Layer 1 w5: v1(-316.85,-858.46) -316.62,-858.23 -280,-858.23 -206,-858.23 -193.5,-858.23 -190.57,-861.16 -190.57,-863.71 -189.07,-865.21 -182.07,-865.21 -180.57,-863.71 -180.57,-854.53 -179.07,-853.03 -172.07,-853.03 -170.57,-854.53 -170.57,-863.71 -169.07,-865.21 -162.07,-865.21 -160.57,-863.71 -160.57,-824.73 -159.07,-823.23 -152.07,-823.23 -150.57,-824.73 -150.57,-863.71 -149.07,-865.21 -142.07,-865.21 -140.57,-863.71 -140.57,-824.73 -139.07,-823.23 -132.07,-823.23 -130.57,-824.73 -130.57,-863.71 -129.07,-865.21 -122.07,-865.21 -120.57,-863.71 -120.57,-833.48 -119.07,-831.98 -112.07,-831.98 -110.57,-833.48 -110.57,-855.3 -107.64,-858.23 -89,-858.23 -0.23,-858.23 v1(0,-858) 0.23,-858.23 31,-858.23 33.5,-858.23 36.43,-855.3 36.43,-845.93 37.93,-844.43 44.93,-844.43 46.43,-845.93 46.43,-863.48 47.93,-864.98 54.93,-864.98 56.43,-863.48 56.43,-839.48 57.93,-837.98 64.93,-837.98 66.43,-839.48 66.43,-863.48 67.93,-864.98 74.93,-864.98 76.43,-863.48 76.43,-833.13 77.93,-831.63 84.93,-831.63 86.43,-833.13 86.43,-863.48 87.93,-864.98 94.93,-864.98 96.43,-863.48 96.43,-837.54 97.93,-836.04 104.93,-836.04 106.43,-837.54 106.43,-863.48 107.93,-864.98 114.93,-864.98 116.43,-863.48 116.43,-839.44 117.93,-837.94 124.93,-837.94 126.43,-839.44 126.43,-863.48 127.93,-864.98 134.93,-864.98 136.43,-863.48 136.43,-848.17 137.93,-846.67 144.93,-846.67 146.43,-848.17 146.43,-855.3 149.36,-858.23 165.18,-858.23 202.56,-858.23 284.41,-858.23 v1(284.64,-858.46) ; v1(77,-352) 77,-334.44 77,-331.94 74.07,-329.01 73,-329.01 71.5,-327.51 71.5,-320.51 73,-319.01 75.5,-319.01 77,-317.51 77,-310.51 75.5,-309.01 73,-309.01 71.5,-307.51 71.5,-300.51 73,-299.01 75.5,-299.01 77,-297.51 77,-290.51 75.5,-289.01 73,-289.01 71.5,-287.51 71.5,-280.51 73,-279.01 74.07,-279.01 77,-276.09 77,-241.94 79.93,-239.01 79.99,-239.01 81.49,-237.51 81.49,-230.51 79.99,-229.01 79.93,-229.01 77,-226.09 77,-217 77,-207.01 94.01,-190 v1(94.24,-190)
  Bottom w4.2: R53.2@-32,-859 -31,-858 v1(0,-858)
DDR3_RAS: R50.2 U1.P4 U2.J3 U3.J3 | length 2366.9
  Top w4.2: U2.J3@-363.98,-826.97 -328.41,-826.97 -283.85,-871.52 v1(-283.85,-874.44) ; v1(33.07,-874) 72,-912.92 72,-1007.21 74.46,-1009.67 86.44,-1009.67 88.9,-1007.21 88.9,-895 88.9,-892.9 86.44,-890.44 70.28,-890.44 68.9,-889.06 68.9,-882.62 70.28,-881.24 92.42,-881.24 93.8,-879.86 93.8,-873.42 92.42,-872.04 76.14,-872.04 74.76,-870.66 74.76,-864.22 76.14,-862.84 92.42,-862.84 93.8,-861.46 93.8,-855.02 92.42,-853.64 86.58,-853.64 85.2,-852.26 85.2,-845.82 86.58,-844.44 92.42,-844.44 93.8,-843.06 93.8,-836.62 92.42,-835.24 86.58,-835.24 85.2,-833.86 85.2,-827.42 86.58,-826.04 92.42,-826.04 93.8,-824.66 93.8,-818.22 92.42,-816.84 91.36,-816.84 88.9,-814.38 88.9,-531.1 90.39,-529.61 90.39,-526.14 89.86,-525.61 89.86,-523.66 94.42,-519.11 96.37,-519.11 100.36,-523.1 102.31,-523.1 106.86,-518.54 106.86,-516.59 97.8,-507.53 97.8,-505.57 102.35,-501.02 104.3,-501.02 109.9,-506.62 113.38,-506.62 118.1,-501.9 118.1,-499.07 118.1,-487.77 120.56,-485.31 138.71,-485.31 140.09,-483.93 140.09,-477.49 138.71,-476.11 118.41,-476.11 117.03,-474.73 117.03,-468.29 118.41,-466.91 149.42,-466.91 150.8,-465.53 150.8,-459.09 149.42,-457.71 118.48,-457.71 117.1,-456.33 117.1,-449.89 118.48,-448.51 149.42,-448.51 150.8,-447.13 150.8,-440.69 149.42,-439.31 119.48,-439.31 118.1,-437.93 118.1,-431.49 119.48,-430.11 139.94,-430.11 141.32,-428.73 141.32,-422.29 139.94,-420.91 120.56,-420.91 118.1,-418.45 118.1,-408.1 v1(116,-406) ; U1.P4@109.99,-205.51 v1(125.74,-221.26) ; U3.J3@237.51,-826.97 273.09,-826.97 317.64,-871.52 v1(317.64,-874.44)
  Layer 1 w5: v1(-283.85,-874.44) -283.62,-874.21 v1@32.86,-874.21 ; v1@33,-873.98 128.98,-873.98 148,-893 184,-893 202.56,-874.44 226,-874.44 228.5,-874.44 231.43,-871.51 231.43,-868.73 232.93,-867.23 239.93,-867.23 241.43,-868.73 241.43,-878.14 242.93,-879.64 249.93,-879.64 251.43,-878.14 251.43,-877.37 254.36,-874.44 288,-874.44 v1(317.64,-874.44) ; v1(116,-406) 114.04,-404.04 100.5,-404.04 92,-395.54 92,-390 92,-387.5 89.07,-384.57 73,-384.57 71.5,-383.07 71.5,-376.07 73,-374.57 96.5,-374.57 98,-373.07 98,-366.07 96.5,-364.57 93,-364.57 91.5,-363.07 91.5,-356.07 93,-354.57 96.5,-354.57 98,-353.07 98,-346.07 96.5,-344.57 91.58,-344.57 90.08,-343.07 90.08,-336.07 91.58,-334.57 96.5,-334.57 98,-333.07 98,-326.07 96.5,-324.57 87.5,-324.57 86,-323.07 86,-316.07 87.5,-314.57 96.5,-314.57 98,-313.07 98,-306.07 96.5,-304.57 87.5,-304.57 86,-303.07 86,-296.07 87.5,-294.57 96.5,-294.57 98,-293.07 98,-286.07 96.5,-284.57 87.5,-284.57 86,-283.07 86,-276.07 87.5,-274.57 99.43,-274.57 110,-264 110,-237 v1(125.74,-221.26)
  Bottom w4.2: v1(33.07,-874) 64,-874 R50.2@65,-873
DDR3_RESET: R58.1 U1.B4 U2.T2 U3.T2 | length 2447.3
  Top w4.2: U2.T2@-395.48,-1047.44 -395.48,-1126.29 v1(-316.85,-1204.92) ; v1(-283.71,-221.27) U1.B4@-267.96,-205.51 ; U3.T2@206.02,-1047.44 206.02,-1126.29 v1(284.64,-1204.92)
  Layer 1 w5: v1(-316.85,-1204.92) -279.08,-1204.92 -257,-1227 -35,-1227 -13.19,-1205.19 -0.73,-1205.19 v1(0,-1204.46) 38.46,-1204.46 61,-1227 87,-1227 99.5,-1227 102.43,-1229.93 102.43,-1230.5 103.93,-1232 110.93,-1232 112.43,-1230.5 112.43,-1228.5 113.93,-1227 120.93,-1227 122.43,-1228.5 122.43,-1230.5 123.93,-1232 130.93,-1232 132.43,-1230.5 132.43,-1227.65 133.93,-1226.15 140.93,-1226.15 142.43,-1227.65 142.43,-1230.5 143.93,-1232 150.93,-1232 152.43,-1230.5 152.43,-1224.5 153.93,-1223 160.93,-1223 162.43,-1224.5 162.43,-1230.45 163.93,-1231.95 170.93,-1231.95 172.43,-1230.45 172.43,-1229.93 175.36,-1227 202,-1227 253,-1227 273.9,-1206.1 283.47,-1206.1 v1(284.64,-1204.92)
  Layer 3 w5: v1(-283.71,-221.27) -281.6,-219.16 -275.44,-219.16 -275.28,-219 -271.84,-219 -257.84,-205 -23,-205 -6.5,-221.5 -6.5,-494.4 -6.8,-494.7 -6.8,-782.9 -6.8,-785.4 -3.87,-788.33 11.7,-788.33 13.2,-789.83 13.2,-796.83 11.7,-798.33 -12.71,-798.33 -14.21,-799.83 -14.21,-806.83 -12.71,-808.33 -9.73,-808.33 -6.8,-811.26 -6.8,-817.6 -6.8,-829.3 18,-854.1 18,-1186.46 v1(0,-1204.46)
  Bottom w4.2: R58.1@-32,-1201.83 -29.38,-1204.46 v1(0,-1204.46)
DDR3_S0: R49.2 U1.N1 U2.L2 U3.L2 | length 2399
  Top w4.2: U2.L2@-395.48,-889.96 -379.44,-906 -332.31,-906 v1(-316.85,-921.45) ; v1(0,-920.99) 1.21,-922.2 43.2,-922.2 53,-932 53,-1015 82.05,-1044.05 82.05,-1106.24 84.51,-1108.7 105.7,-1108.7 113,-1101.4 113,-1083.52 113,-1081.42 110.54,-1078.96 94.38,-1078.96 93,-1077.58 93,-1071.14 94.38,-1069.76 114.42,-1069.76 115.8,-1068.38 115.8,-1061.94 114.42,-1060.56 94.38,-1060.56 93,-1059.18 93,-1052.74 94.38,-1051.36 113.61,-1051.36 114.99,-1049.98 114.99,-1043.54 113.61,-1042.16 110.54,-1042.16 109.16,-1040.78 109.16,-1034.34 110.54,-1032.96 113,-1030.5 113,-1008 113,-543 172,-484 176,-480 176,-469.22 178.46,-466.76 187.42,-466.76 188.8,-465.38 188.8,-458.94 187.42,-457.56 177.38,-457.56 176,-456.18 176,-449.74 177.38,-448.36 187.42,-448.36 188.8,-446.98 188.8,-440.54 187.42,-439.16 168.58,-439.16 167.2,-437.78 167.2,-431.34 168.58,-429.96 173.54,-429.96 176,-427.5 176,-421 176,-412 170.01,-406.01 162.02,-398.02 162.02,-394.54 165.5,-391.05 165.5,-389.1 160.95,-384.55 159,-384.55 154.75,-388.8 152.8,-388.8 148.24,-384.24 148.24,-382.29 152.49,-378.04 152.49,-376.09 147.94,-371.53 145.99,-371.53 135.71,-381.81 133.75,-381.81 129.2,-377.26 129.2,-375.31 139.48,-365.03 139.48,-363.08 134.93,-358.52 132.98,-358.52 122.57,-368.92 120.62,-368.92 116.07,-364.37 116.07,-362.42 126.47,-352.02 126.47,-350.07 121.92,-345.51 119.96,-345.51 94.5,-370.98 92.55,-370.98 88,-366.42 88,-364.47 113.46,-339.01 113.46,-337.06 108.91,-332.5 106.95,-332.5 93.17,-346.28 91.22,-346.28 86.67,-341.73 86.67,-339.78 100.45,-326 100.45,-324.05 95.89,-319.49 93.94,-319.49 90.46,-322.98 86.98,-322.98 85.14,-321.14 80.47,-316.47 80.47,-301.97 U1.N1@78.5,-300 ; U3.L2@206.02,-889.96 222.06,-906 269.19,-906 v1(284.64,-921.45)
  Layer 1 w5: v1(-316.85,-921.45) -244.55,-921.45 -237.57,-928.43 -219.57,-928.43 -196,-952 -119,-952 -87.99,-920.99 v1(0,-920.99) 39,-920.99 41.5,-920.99 44.43,-918.06 44.43,-916.05 45.93,-914.55 52.93,-914.55 54.43,-916.05 54.43,-926.47 55.93,-927.97 62.93,-927.97 64.43,-926.47 64.43,-917.61 65.93,-916.11 72.93,-916.11 74.43,-917.61 74.43,-923.92 75.93,-925.42 82.93,-925.42 84.43,-923.92 87.36,-920.99 98.1,-920.99 115.99,-920.99 144,-949 184.83,-949 212.38,-921.45 v1(284.64,-921.45)
  Bottom w4.2: R49.2@-32,-921.33 -31.66,-920.99 v1(0,-920.99)
DDR3_WE: R52.2 U1.M5 U2.L3 U3.L3 | length 2320.8
  Top w4.2: U2.L3@-363.98,-889.96 v1(-316.85,-889.96) ; U1.M5@47,-174.02 v1(63,-190) ; U3.L3@237.51,-889.96 v1(284.64,-889.96)
  Layer 1 w5: v1(-316.85,-889.96) -316.62,-889.73 -0.23,-889.73 v1(0,-889.49) 0.23,-889.73 124.73,-889.73 141,-906 190,-906 206.27,-889.73 208.77,-889.73 211.7,-886.8 211.7,-884.94 213.2,-883.44 220.2,-883.44 221.7,-884.94 221.7,-895.11 223.2,-896.61 230.2,-896.61 231.7,-895.11 231.7,-892.66 234.63,-889.73 253,-889.73 284.41,-889.73 v1(284.64,-889.96)
  Layer 2 w5: v1(0,-889.49) -14.5,-874.99 -14.5,-812.5 6,-792 6,-744 6,-736.81 6,-646 6,-643.5 3.07,-640.57 -16.8,-640.57 -19,-638.37 -19,-631.77 -16.8,-629.57 28.8,-629.57 31,-627.37 31,-620.77 28.8,-618.57 -16.8,-618.57 -19,-616.37 -19,-609.77 -16.8,-607.57 28.8,-607.57 31,-605.37 31,-598.77 28.8,-596.57 -16.8,-596.57 -19,-594.37 -19,-587.77 -16.8,-585.57 28.8,-585.57 31,-583.37 31,-576.77 28.8,-574.57 -16.8,-574.57 -19,-572.37 -19,-565.77 -16.8,-563.57 28.8,-563.57 31,-561.37 31,-554.77 28.8,-552.57 -16.8,-552.57 -19,-550.37 -19,-543.77 -16.8,-541.57 28.8,-541.57 31,-539.37 31,-532.77 28.8,-530.57 -16.8,-530.57 -19,-528.37 -19,-521.77 -16.8,-519.57 28.8,-519.57 31,-517.37 31,-510.77 28.8,-508.57 -16.8,-508.57 -19,-506.37 -19,-499.77 -16.8,-497.57 28.8,-497.57 31,-495.37 31,-488.77 28.8,-486.57 -16.8,-486.57 -19,-484.37 -19,-477.77 -16.8,-475.57 26.3,-475.57 28.5,-473.37 28.5,-466.77 26.3,-464.57 -6.3,-464.57 -8.5,-462.37 -8.5,-455.77 -6.3,-453.57 16.37,-453.57 18.57,-451.37 18.57,-444.77 16.37,-442.57 8.93,-442.57 6,-439.64 6,-361.5 6,-315 48,-273 48,-205 v1(63,-190)
  Bottom w4.2: R52.2@-32,-890.17 -31.33,-889.49 v1(0,-889.49)